# Altium PCB layout_altium.pcbdoc
Units mil, origin at the board's own origin, x right, y up, seen from the top; angles counter-clockwise.
Board outline 3480 x 4170.06 mil, 2 copper layers (Top Layer, Bottom Layer); 53 components, 61 nets, 223 pads, 89 vias.
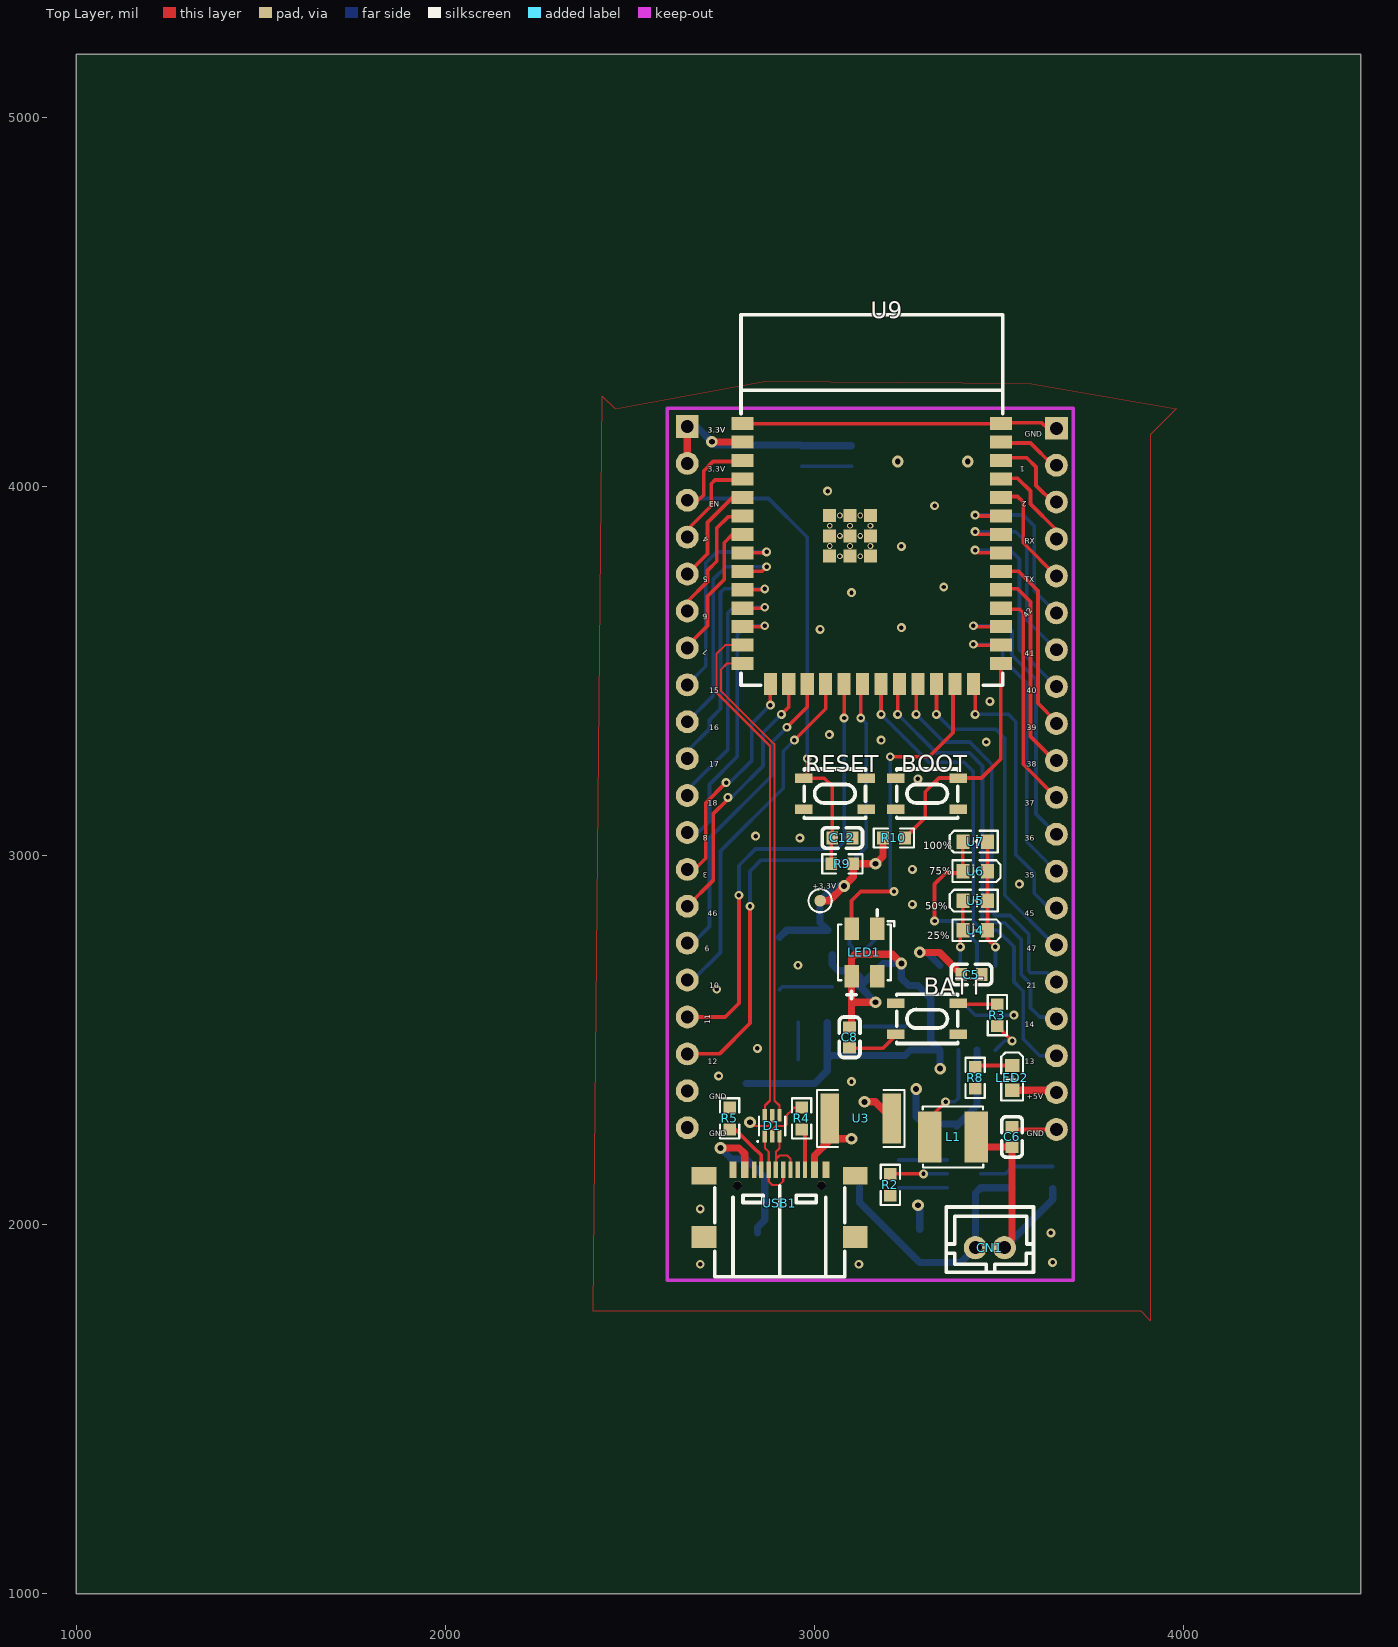
[diagram p0: Top Layer view]
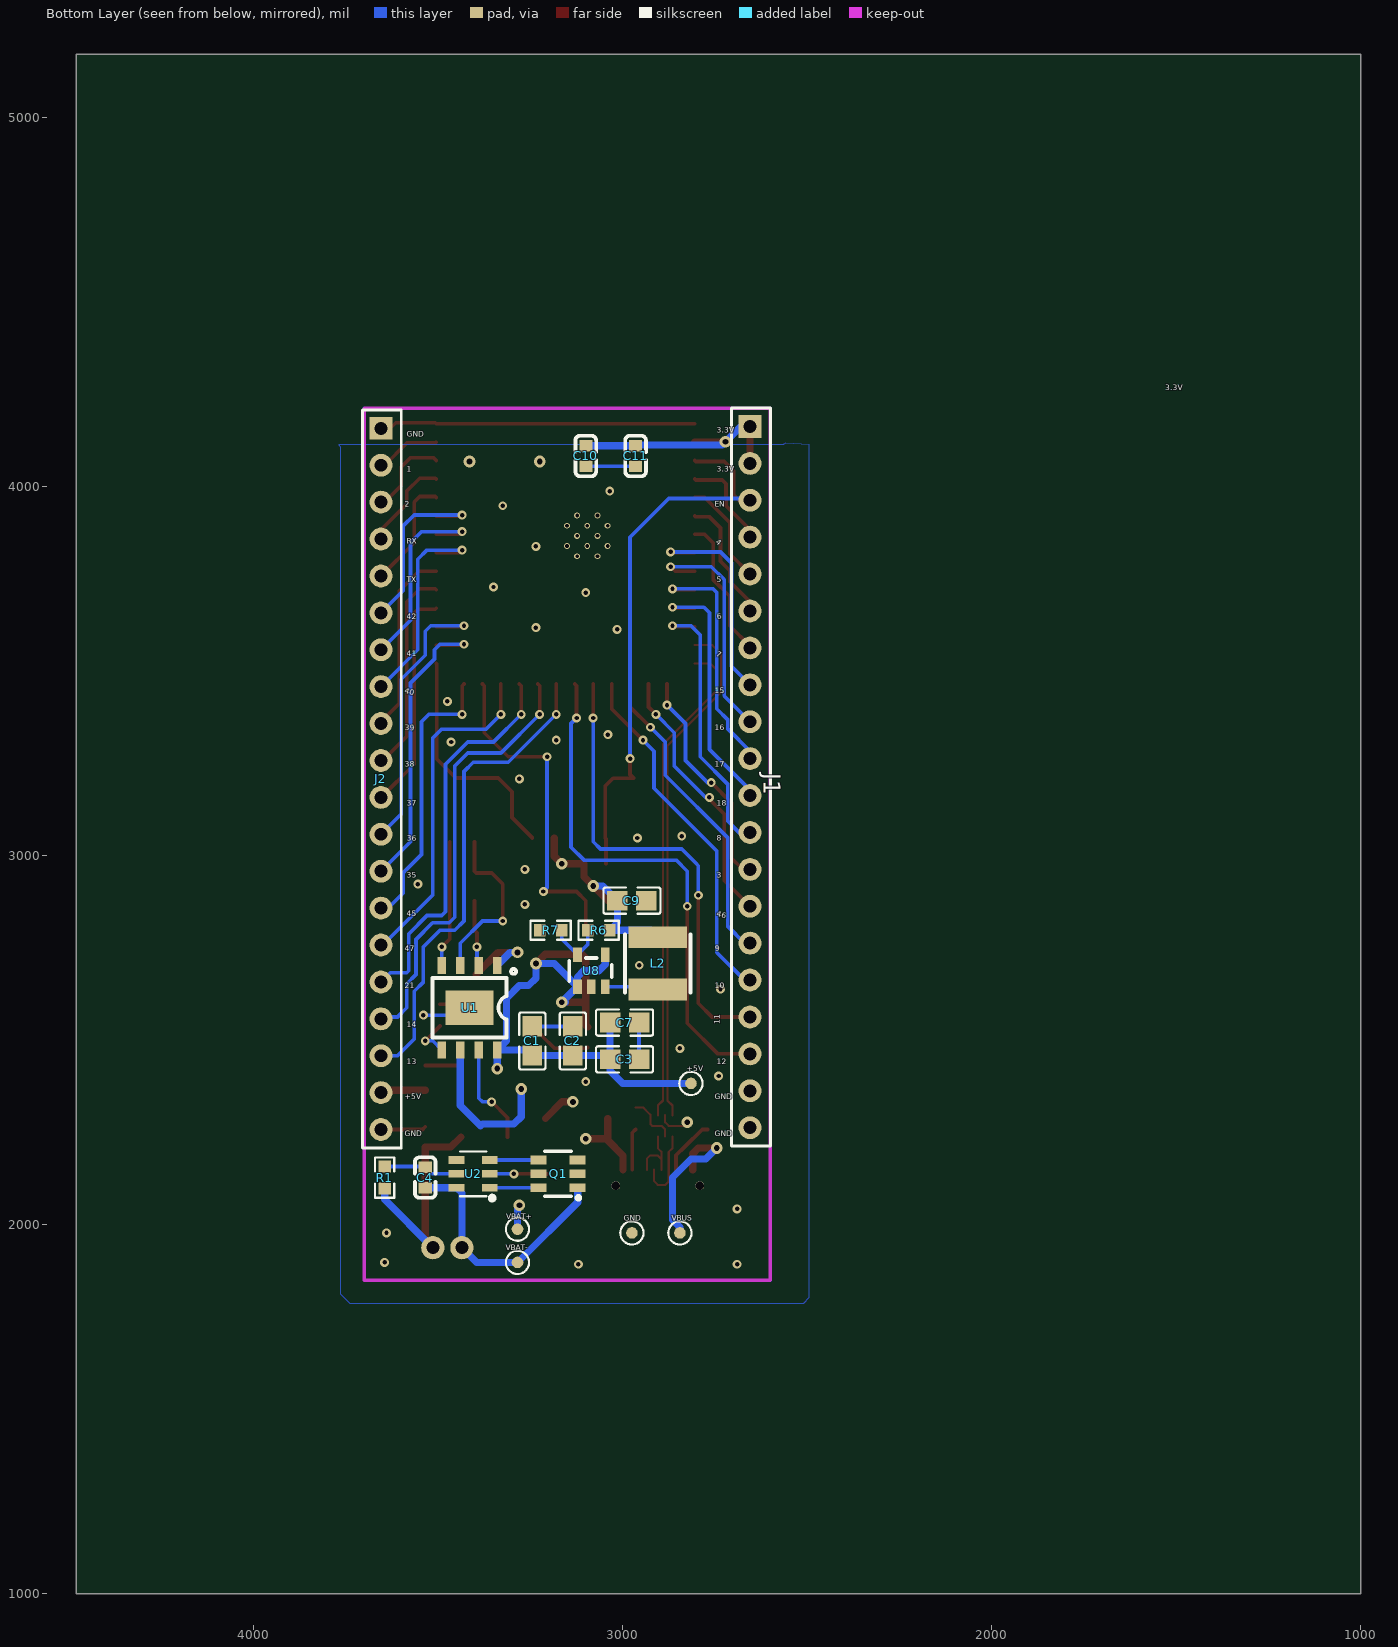
[diagram p1: Bottom Layer view, seen from below]

## Layer stack, top to bottom
Top Layer: signal copper (thickness not stored)
Dielectric: dielectric 12.6, FR-4, Dk 4.8
Bottom Layer: signal copper (thickness not stored)

## Board outline
4480,1000 1000,1000 1000,5170.06 4480,5170.06

## Components (designator, comment, footprint, x,y, rotation, side; value= is the part's Value field where it differs from the comment)
+3.3V "3.3v" TEST_POINT_W1 3015,2877.16 r0 top
+5V "5v" TEST_POINT_W1 2815,2382.16 r0 bottom
BATT "ip5306_switch" SW-SMD_4P-L4.2-W3.4-P2.15-LS5.2 3305,2557.16 r0 top
BOOT "Boot" SW-SMD_4P-L4.2-W3.4-P2.15-LS5.2 3305,3167.16 r0 top
C1 "22u" C0805 3245,2497.16 r90 bottom
C2 "22u" C0805 3135,2497.16 r90 bottom
C3 "22u" C0805 2995,2447.16 r180 bottom
C4 "0.1u" C0603#1 3535,2127.16 r90 bottom
C5 "10u" C0603#2 3425,2677.16 r180 top
C6 "10u" C0603#2 3535,2237.16 r270 top
C7 "22u" C0805 2995,2547.16 r0 bottom
C8 "10u" C0603#2 3095,2507.16 r90 top
C9 "22u" C0805 2975,2877.16 r180 bottom
C10 "0.1u" C0603#1 3100,4082.16 r90 bottom
C11 "10u" C0603#1 2965,4082.16 r90 bottom
C12 "1u" C0603#2 3075,3047.16 r180 top
CN1 "Battery" CONN-TH_B2B-PH-K-S 3475,1937.16 r0 top
D1 "USBLC6-2P6" SOT-666-6_L1.6-W1.2-P0.50-LS1.6-BR 2885,2267.16 r270 top
GND "GND" TEST_POINT_W1 2975,1977.16 r0 bottom
J1 "left" HDR-M-2.54_1X20 2655,3212.16 r90 bottom
J2 "Right" HDR-M-2.54_1X20 3655,3207.16 r90 bottom
L1 "1uH" IND-SMD_L4.0-W4.0 3375,2237.16 r0 top
L2 "2.2uH" IND-SMD_L4.0-W4.0_LQH44PN2R2MP0L 2905,2707.16 r90 bottom
LED1 "WS2812B-3535" LED-SMD_4P-L3.5-W3.5-TL_WS2812B 3135,2737.16 r90 top
LED2 "power" LED0603-FD 3535,2397.16 r90 top
Q1 "FS8205A_C2830320" SOT-23-6_L2.9-W1.6-P0.95-LS2.8-BR 3175,2137.16 r0 bottom
R1 "100R" R0603#1 3645,2127.16 r90 bottom
R2 "1k" R0603#2 3205,2107.16 r90 top
R3 "10k" R0603#2 3495,2567.16 r90 top
R4 "5.1kΩ" R0603#2 2965,2287.16 r90 top
R5 "5.1kΩ" R0603#2 2770,2287.16 r270 top
R6 "453k" R0603#1 3065,2797.16 r0 bottom
R7 "100k" R0603#1 3195,2797.16 r0 bottom
R8 "470R" R0603#2 3435,2397.16 r270 top
R9 "10k" R0603#2 3075,2977.16 r180 top
R10 "10k" R0603#2 3215,3047.16 r0 top
RESET "reset" SW-SMD_4P-L4.2-W3.4-P2.15-LS5.2 3055,3167.16 r0 top
U1 "IP5306" ESOP-8_L4.9-W3.9-P1.27-LS6.0-BL-EP 3415,2587.16 r180 bottom
U2 "DW01A_C351410" SOT-23-6_L2.9-W1.6-P0.95-LS2.8-BL 3405,2137.16 r270 bottom
U3 "PTC" R1812 3125,2287.16 r0 top
U4 "25%" LED0603-FD 3434.97,2797.16 r0 top
U5 "50%" LED0603-FD 3434.97,2877.16 r180 top
U6 "75%" LED0603-FD 3434.97,2957.16 r0 top
U7 "100%" LED0603-FD 3434.97,3037.16 r180 top
U8 "RY3420" SOT-23-5_L2.9-W1.6-P0.95-LS2.8-BL 3085,2687.16 r0 bottom
U9 "ESP32-S3-WROOM-1-N8" WIFIM-SMD_ESP32-S3-WROOM-1-N8 3155,3817.16 r0 top
USB1 "TYPE-C 16P QTWT" USB-TYPE-C-SMD_TYPE-C-16P-QTWT 2905,2057.16 r0 top
VBAT+ "Vbat+" TEST_POINT_W1 3285,1987.16 r0 bottom
VBAT- "Vbat-" TEST_POINT_W1 3285,1897.16 r0 bottom
VBUS "Vbus" TEST_POINT_W1 2845,1977.16 r0 bottom
? "" ? 3155,4414.12 r0 top
? "" ? 2327.87,3029.66 r0 top
? "" ? 3150,1677.08 r0 top

## Footprints (in the part's own frame and the unit in brackets; to place one, negate y for a bottom-side part, rotate by r counter-clockwise, add the part's x,y. Pads: shape width x height; smd on the part's side, far side on the other; paste and mask are expansions set on the pad)
C0603#1 [mm]
  rect 0.8x0.9 smd paste+0 mask+0.051: 1(0.7,0) 2(-0.7,0)
  silkscreen extent -1.39,-0.71 1.39,0.71
C0603#2 [mm]
  rect 0.8x0.9 smd paste+0 mask+0.051: 1(-0.7,0) 2(0.7,0)
  silkscreen extent -1.39,-0.71 1.39,0.71
C0805 [mm]
  rect 1.41x1.35 smd paste-100 mask+0.051: 1(1,0) 2(-1,0)
  silkscreen extent -1.96,-0.9 1.96,0.9
CONN-TH_B2B-PH-K-S [mm]
  round 1.6 hole 0.9 paste+0 mask+0.051: 1(1,0) 2(-1,0)
  silkscreen extent -3,-1.7 3,2.8
ESOP-8_L4.9-W3.9-P1.27-LS6.0-BL-EP [mm]
  rect 0.6x1.2 smd paste+0 mask+0.051: 1(1.905,2.908) 2(0.635,2.908) 3(-0.635,2.908) 4(-1.905,2.908) 5(-1.905,-2.908) 6(-0.635,-2.908) 7(0.635,-2.908) 8(1.905,-2.908)
  rect 3.3x2.4 smd paste+0 mask+0.051: 9(0,0)
  silkscreen extent -2.55,-2.05 3.2,2.67
HDR-M-2.54_1X20 [mil]
  rect 62x62 hole 35 paste+0 mask+2: 1(950,0)
  round 62 hole 35 paste+0 mask+2: 2(850,0) 3(750,0) 4(650,0) 5(550,0) 6(450,0) 7(350,0) 8(250,0) 9(150,0) 10(50,0) 11(-50,0) 12(-150,0) 13(-250,0) 14(-350,0) 15(-450,0) 16(-550,0) 17(-650,0) 18(-750,0) 19(-850,0) 20(-950,0)
  silkscreen extent -1000,-55 1000,50
IND-SMD_L4.0-W4.0 [mm]
  rect 1.6x3.5 smd paste+0 mask+0.051: 1(-1.6,0) 2(1.6,0)
  silkscreen extent -2.08,-2.1 2.08,2.1
IND-SMD_L4.0-W4.0_LQH44PN2R2MP0L [mm]
  rect 1.5x4 smd paste+0 mask+0.051: 1(1.8,0) 2(-1.8,0)
  silkscreen extent -2,-2.25 2,2.25
LED0603-FD [mm]
  rect 0.9x1 smd paste+0 mask+0.051: 1(-0.85,0) 2(0.85,0)
  silkscreen extent -1.55,-0.75 1.75,0.75
LED-SMD_4P-L3.5-W3.5-TL_WS2812B [mm]
  rect 1.545x0.997 smd paste+0 mask+0.051: 1(-1.638,0.89) 2(-1.638,-0.89) 3(1.638,-0.89) 4(1.638,0.89)
  silkscreen extent -3.17,-2.04 2.92,1.82
R0603#1 [mil]
  rect 31.75x34.02 smd paste-3937.01 mask+2: 1(29.66,0) 2(-29.65,0)
  silkscreen extent -55,-26 55,26
R0603#2 [mil]
  rect 31.75x34.02 smd paste-3937.01 mask+2: 1(-29.65,0) 2(29.66,0)
  silkscreen extent -55,-26 55,26
R1812 [mil]
  rect 50.49x136.06 smd paste-3937.01 mask+2: 1(-84.3,0) 2(84.3,0)
  silkscreen extent -119,-77 119,77
SOT-23-5_L2.9-W1.6-P0.95-LS2.8-BL [mm]
  rect 0.6x1 smd paste+0 mask+0.05: 1(0.95,1.1) 2(0,1.1) 3(-0.95,1.1) 4(-0.95,-1.1) 5(0.95,-1.1)
  silkscreen extent -1.4,-0.89 1.52,0.7
SOT-23-6_L2.9-W1.6-P0.95-LS2.8-BL [mm]
  rect 0.532x1.072 smd paste+0 mask+0.051: 1(0.95,1.149) 2(0,1.149) 3(-0.95,1.149) 4(-0.95,-1.149) 5(0,-1.149) 6(0.95,-1.149)
  silkscreen extent -1.54,-0.89 1.82,1.45
SOT-23-6_L2.9-W1.6-P0.95-LS2.8-BR [mm]
  rect 1.1x0.6 smd paste+0 mask+0.051: 1(-1.35,0.95) 2(-1.35,0) 3(-1.35,-0.95) 4(1.35,-0.95) 5(1.35,0) 6(1.35,0.95)
  silkscreen extent -1.52,-1.55 0.9,1.78
SOT-666-6_L1.6-W1.2-P0.50-LS1.6-BR [mm]
  rect 0.85x0.3 smd paste+0 mask+0.051: 1(0.725,-0.5) 2(0.725,0) 3(0.725,0.5) 4(-0.725,0.5) 5(-0.725,0) 6(-0.725,-0.5)
  silkscreen extent -0.65,-1 1.07,0.9
SW-SMD_4P-L4.2-W3.4-P2.15-LS5.2 [mm]
  rect 1.2x0.65 smd paste+0 mask+0.051: 1(-2.15,1.075) 2(2.15,1.075) 3(-2.15,-1.075) 4(2.15,-1.075)
  silkscreen extent -2.1,-1.7 2.1,1.7
TEST_POINT_W1 [mm]
  round 0.8 smd paste+0 mask+0.05: 1(0,0)
  silkscreen extent -0.8,-0.8 0.8,0.8
USB-TYPE-C-SMD_TYPE-C-16P-QTWT [mm]
  rect 1.7x1.5 smd paste+0 mask+0.051: 0(-5.2,-2.309) 0(5.2,-2.309)
  rect 1.7x1.2 smd paste+0 mask+0.051: 0(-5.2,1.891) 0(5.2,1.891)
  rect 0.5x1.14 smd paste+0 mask+0.051: A1B12(-3.2,2.308) A4B9(-2.4,2.308) B1A12(3.2,2.308) B4A9(2.4,2.308)
  rect 0.3x1.14 smd paste+0 mask+0.051: A5(-1.25,2.308) A6(-0.25,2.308) A7(0.25,2.308) A8(1.25,2.309) B5(1.75,2.308) B6(0.75,2.308) B7(-0.75,2.308) B8(-1.75,2.309)
  round 0.6 hole 0.6 unplated paste+0: ""(-2.89,1.221) ""(2.89,1.221)
  silkscreen extent -4.46,-5.05 4.48,1.2
WIFIM-SMD_ESP32-S3-WROOM-1-N8 [mm]
  rect 1.5x0.9 smd paste+0 mask+0.05: 1(-8.9,8.955) 2(-8.9,7.685) 3(-8.9,6.415) 4(-8.9,5.145) 5(-8.9,3.875) 6(-8.9,2.605) 7(-8.9,1.335) 8(-8.9,0.065) 9(-8.9,-1.205) 10(-8.9,-2.475) 11(-8.9,-3.745) 12(-8.9,-5.015) 13(-8.9,-6.285) 14(-8.9,-7.555) 27(8.9,-7.555) 28(8.9,-6.285) 29(8.9,-5.015) 30(8.9,-3.745) 31(8.9,-2.475) 32(8.9,-1.205) 33(8.9,0.065) 34(8.9,1.335) 35(8.9,2.605) 36(8.9,3.875) 37(8.9,5.145) 38(8.9,6.415) 39(8.9,7.685) 40(8.9,8.955)
  rect 0.9x1.5 smd paste+0 mask+0.05: 15(-6.985,-8.955) 16(-5.715,-8.955) 17(-4.445,-8.955) 18(-3.175,-8.955) 19(-1.905,-8.955) 20(-0.635,-8.955) 21(0.635,-8.955) 22(1.905,-8.955) 23(3.175,-8.955) 24(4.445,-8.955) 25(5.715,-8.955) 26(6.985,-8.955)
  rect 0.9x0.9 smd paste+0 mask+0.051: 41(-2.9,-0.165) 41(-2.9,1.235) 41(-2.9,2.635) 41(-1.5,-0.165) 41(-1.5,1.235) 41(-1.5,2.635) 41(-0.1,-0.165) 41(-0.1,1.235) 41(-0.1,2.635)
  silkscreen extent -9,-9.05 9,16.45
? [mil]

## Via types
v1: diameter 24.02, hole 12.01, Top Layer to Bottom Layer, tented both sides, 62 vias
v2: diameter 31.5, hole 15.75, Top Layer to Bottom Layer, tented both sides, 15 vias
v3: diameter 15.75, hole 9.84, Top Layer to Bottom Layer, tented both sides, 12 vias

## Nets (pads, with @x,y where several pads share a name; then routed paths per layer and width w, separated by ;. In a path a pad name is that pad's centre, name@x,y a point inside that pad or via, vN(x,y) a via of type N, cw(c..) or ccw(c..) an arc to the next point about the centre after c; other vN are vias at no path point)
3.3V: +3.3V.1 C9.2 C10.1 C11.1 J1.1 J1.2 L2.1 R6.2 R9.1 R10.1 U9.2 | length 2871.6
  Top Layer w19.68: J1.2 J1.1 ; v2(2721.59,4120.57) U9.2 ; +3.3V.1 3040,2877.16 v2(3080,2917.16) 3104.66,2941.82 R9.1 v2(3165,2977.16) 3185.34,2997.5 R10.1
  Mid-Layer 2 w19.68: v2(2721.59,4120.57) 2866.59,4120.57 2885,4102.16 2885,3932.16 2945,3872.16 2945,3577.16 2815,3447.16 2815,3152.16 2875,3092.16 3050,3092.16 v2(3165,2977.16)
  Bottom Layer w19.68: J1.1 2680,4162.16 v2(2721.59,4120.57) 2730,4112.16 2962.56,4112.16 C11.1 C10.1 ; L2.1 2924.13,2797.16 R6.2 3014.37,2818.13 C9.2 3054.37,2917.16 v2(3080,2917.16)
+5V: +5V.1 C1.2 C2.2 C3.2 C7.1 C8.2 J2.19 LED1.1 LED2.1 U1.8 U8.1 U8.4 | length 2260.6
  Top Layer w19.68: C8.2 3099.96,2539.68 LED1.1 3099.96,2722.12 3110,2732.16 3210,2732.16 v2(3235,2707.16) ; 3099.96,2594.04 3108.08,2602.16 v2(3165,2602.16) ; LED2.1 3648.47,2363.7 J2.19
  Mid-Layer 2 w19.68: v2(3340,2422.16) 3340,2397.16 3375,2362.16 3650,2362.16 J2.19
  Bottom Layer w19.68: +5V.1 3000,2382.16 3034.37,2416.53 C3.2 ; C7.1 C3.2 ; U8.4 3047.6,2704.56 3065,2687.16 3106,2687.16 3122.4,2670.76 U8.1 ; v2@3155,2602.16 v2(3165,2602.16) 3123.31,2643.85 U8.1 ; v2(3340,2422.16) U1.8 ; C3.2 3045,2457.79 C2.2 C1.2 3259.87,2472.66 U1.8 ; U8.1 3185.71,2707.16 v2(3235,2707.16) 3235,2667.16 3255,2647.16 3280,2647.16 3315,2612.16 3315,2497.66 U1.8
BATT_2: BATT.2 R3.2 | length 106.5
  Top Layer w10: BATT.2 3392.31,2596.82 R3.2
BOOT: BOOT.2 R10.2 U9.27 | length 648
  Top Layer w10: R10.2 3300,3102.5 3300,3172.16 3337.32,3209.49 BOOT.2 ; BOOT.2 3452.3,3209.46 3504,3261.16 3504,3518.36 U9.27
D_ESD_N: D1.6 U9.13 | length 1396.5
  Top Layer w5.95: 2733.95,3503.16 2733.95,3441.17 2752.95,3422.17 2878.98,3296.15 2878.98,2376.1 2878.98,2336.1 2865.32,2322.44 D1.6 ; 2734,3503.16 2734,3546.16 2757.5,3569.66 U9.13
D_ESD_P: D1.4 U9.14 | length 1338.7
  Top Layer w5.95: U9.14 2762.55,3519.7 2746,3503.16 2746,3446.16 2891.02,3301.14 2891.02,2336.1 2904.68,2322.44 D1.4
D_N: D1.1 USB1.A7 USB1.B7 | length 204.5
  Top Layer w5.98: D1.1 2865.32,2206.84 2875.47,2196.7 USB1.B7 ; USB1.B7@2875.5,2148.06 2875.5,2116.66 2885,2107.16 2905,2107.16 2914.8,2117.36 USB1.A7@2914.8,2148.06
D_P: D1.3 USB1.A6 USB1.B6 | length 171.3
  Top Layer w5.98: USB1.A6@2895.2,2148.06 2895.2,2196.96 2904.7,2206.86 D1.3@2904.7,2238.66 ; 2895.2,2177.16 2905,2186.96 2925,2187.16 2934.5,2177.66 USB1.B6@2934.5,2148.06
EN: C12.2 J1.3 R9.2 RESET.1 U9.3 | length 1556.8
  Top Layer w10: J1.3 2685,3962.16 2700,3977.16 2700,4042.16 2725,4067.16 2802.07,4067.16 U9.3 ; RESET.1 2980,3219.13 v1(2980,3262.16) ; RESET.1 3026,3209.16 3047.4,3187.76 C12.2 ; R9.2 3045.34,3045.06 C12.2
  Bottom Layer w10: J1.3 2660,3967.16 2875,3967.16 2980,3862.16 v1(2980,3262.16)
GND: BATT.3 BOOT.3 C1.1 C2.1 C3.1 C5.1 C6.1 C7.2 C8.1 C9.1 C10.2 C11.2 C12.1 D1.2 GND.1 J1.19 J1.20 J2.1 J2.20 LED1.3 Q1.3 R2.1 R4.2 R5.1 R7.1 R8.2 RESET.3 RESET.4 U1.9 U8.2 U9.1 U9.40 U9.41 USB1.0 USB1.A1B12 USB1.B1A12 | length 1740.3
  Top Layer w5.95: D1.2 2884.99,2257.16 2895,2267.16 2920,2267.16 2925,2272.16 2925,2297.16 2939,2311.16 2944.66,2316.82 R4.2
  Top Layer w10: U9.1 U9.40 3507.84,4172.16 3615,4172.16 3630,4157.16 J2.1 ; C8.1 3097.44,2477.16 3185,2477.16 3220.36,2512.51 BATT.3 ; C6.1 3542.56,2257.16 J2.20
  Bottom Layer w10: C3.1 C7.2 ; C11.2 C10.2 ; C2.1 C1.1 ; U1.9 3435,2567.16 v1(3540,2567.16)
  other v1: 2690,1892.16 3120,1892.16 3645,1897.16 3640,1977.16 2690,2042.16 3100,2387.16 2740,2402.16 2845,2477.16 2735,2637.16 2955,2702.16 3265,2867.16 3555,2922.16 3265,2962.16 2960,3047.16 2840,3052.16 3280,3207.16 3465,3307.16 3180,3312.16 3040,3327.16 3475,3417.16 3015,3612.16 3235,3617.16 3100,3712.16 3350,3727.16 3235,3837.16 3325,3947.16 3035,3987.16
  other v2: 3225,4067.16 3415,4067.16
IO1: J2.2 U9.39 | length 175.5
  Top Layer w10: U9.39 3507.93,4117.16 3585,4117.16 3645,4057.16 J2.2
IO2: J2.3 U9.38 | length 231.7
  Top Layer w10: U9.38 3512.84,4077.16 3575,4077.16 3600,4052.16 3600,4002.16 3645,3957.16 J2.3
IO3: J1.13 U9.15 | length 613.2
  Top Layer w10: J1.13 2675,2962.16 2705,2992.16 2705,3142.16 v1(2760,3197.16) ; v1(2880,3407.16) U9.15
  Bottom Layer w10: v1(2760,3197.16) 2770,3197.16 2830,3257.16 2830,3277.16 2830,3357.16 v1(2880,3407.16)
IO4: J1.4 U9.4 | length 261.7
  Top Layer w10: J1.4 2655,3882.16 2720,3947.16 2720,4007.16 2730,4017.16 2802.07,4017.16 U9.4
IO5: J1.5 U9.5 | length 285.4
  Top Layer w10: J1.5 2710,3817.16 2710,3902.16 2777.55,3969.7 U9.5
IO6: J1.6 U9.6 | length 341.2
  Top Layer w10: J1.6 2655,3687.16 2710,3742.16 2710,3772.16 2735,3797.16 2735,3887.16 2765,3917.16 2802.07,3917.16 U9.6
IO7: J1.7 U9.7 | length 385.4
  Top Layer w10: J1.7 2655,3567.16 2710,3622.16 2710,3702.16 2755,3747.16 2755,3847.16 2777.55,3869.7 U9.7
IO8: J1.12 U9.12 | length 755.2
  Top Layer w10: U9.12 2862.55,3619.7 v1(2865,3622.16)
  Bottom Layer w10: J1.12 2685,3062.16 2715,3092.16 2715,3192.16 2790,3267.16 2790,3597.16 2815,3622.16 v1(2865,3622.16)
IO9: J1.15 U9.17 | length 845.9
  Top Layer w10: v1(2925,3347.16) 2980.01,3402.16 U9.17
  Bottom Layer w10: J1.15 2670,2762.16 2715,2807.16 2715,3047.16 2885,3217.16 2885,3307.16 v1(2925,3347.16)
IO10: J1.16 U9.18 | length 966.6
  Top Layer w10: v1(2945,3312.16) 3030.01,3397.16 U9.18
  Bottom Layer w10: J1.16 2670,2662.16 2745,2737.16 2745,3012.16 2915,3182.16 2915,3282.16 v1(2945,3312.16)
IO11: J1.17 U9.19 | length 1267.7
  Top Layer w10: J1.17 2758,2562.16 2795,2599.16 v1(2795,2892.16) ; v1(3080,3372.16) U9.19@3080,3464.66
  Bottom Layer w10: v1(2795,2892.16) 2795,2972.16 2800,2977.16 2840,3017.16 2890,3017.16 3060,3017.16 3080,3037.16 3080,3087.16 v1(3080,3372.16)
IO12: J1.18 U9.20 | length 1409
  Top Layer w10: J1.18 2742,2462.16 2825,2545.16 v1(2825,2862.16) ; v1(3125,3372.16) 3125,3459.61 U9.20
  Bottom Layer w10: v1(2825,2862.16) 2825,2957.16 2855,2987.16 2900,2987.16 2955,2987.16 3105,2987.16 3140,3022.16 3140,3357.16 v1(3125,3372.16)
IO13: J2.18 U9.21 | length 1309.7
  Top Layer w10: v1(3180,3382.16) U9.21@3180,3464.66
  Bottom Layer w10: v1(3180,3382.16) 3310,3252.16 3405,3252.16 3430,3227.16 3430,2822.16 3455,2797.16 3495,2797.16 3540,2752.16 3540,2657.16 3565,2632.16 3565,2502.16 3610,2457.16 J2.18
IO14: J2.17 U9.22 | length 1190.2
  Top Layer w10: v1(3225,3382.16) 3225,3459.61 U9.22
  Bottom Layer w10: v1(3225,3382.16) 3330,3277.16 3420,3277.16 3455,3242.16 3455,2832.16 3470,2817.16 3515,2817.16 3560,2772.16 3560,2677.16 3585,2652.16 3585,2587.16 3610,2562.16 3650,2562.16 J2.17
IO15: J1.8 U9.8 | length 594.5
  Top Layer w10: U9.8 2867.55,3819.7 v1(2870,3822.16)
  Bottom Layer w10: J1.8 2705,3512.16 2705,3792.16 2735,3822.16 v1(2870,3822.16)
IO16: J1.9 U9.9 | length 644
  Top Layer w10: U9.9 2857.55,3769.7 v1(2870,3782.16)
  Bottom Layer w10: J1.9 2725,3432.16 2725,3747.16 2760,3782.16 v1(2870,3782.16)
IO17: J1.10 U9.10 | length 672.8
  Top Layer w10: U9.10 2862.55,3719.7 v1(2865,3722.16)
  Bottom Layer w10: J1.10 2655,3282.16 2715,3342.16 2715,3367.16 2745,3397.16 2745,3712.16 2755,3722.16 v1(2865,3722.16)
IO18: J1.11 U9.11 | length 708.2
  Top Layer w10: U9.11 2862.55,3669.7 v1(2865,3672.16)
  Bottom Layer w10: J1.11 2655,3177.16 2765,3287.16 2765,3657.16 2780,3672.16 v1(2865,3672.16)
IO21: J2.16 U9.23 | length 1057.7
  Top Layer w10: v1(3275,3382.16) 3275,3459.61 U9.23
  Bottom Layer w10: v1(3275,3382.16) 3350,3307.16 3420,3307.16 3480,3247.16 3480,2847.16 3490,2837.16 3530,2837.16 3580,2787.16 3580,2687.16 3585,2682.16 3630,2682.16 J2.16
IO35: J2.13 U9.28 | length 822.7
  Top Layer w10: v1(3430,3572.16) 3432.45,3569.7 U9.28
  Bottom Layer w10: v1(3430,3572.16) 3495,3572.16 3510,3557.16 3510,3532.16 3575,3467.16 3575,3037.16 J2.13
IO36: J2.12 U9.29 | length 787.3
  Top Layer w10: v1(3430,3622.16) 3432.45,3619.7 U9.29
  Bottom Layer w10: v1(3430,3622.16) 3520,3622.16 3535,3607.16 3535,3542.16 3600,3477.16 3600,3112.16 J2.12
IO37: J2.11 U9.30 | length 602.1
  Top Layer w10: U9.30 3507.93,3667.16 3555,3667.16 3565,3657.16 3565,3247.16 J2.11
IO38: J2.10 U9.31 | length 557.1
  Top Layer w10: U9.31 3507.84,3722.16 3550,3722.16 3585,3687.16 3585,3322.16 3650,3257.16 J2.10
IO39: J2.9 U9.32 | length 502.1
  Top Layer w10: U9.32 3552.45,3769.7 3605,3717.16 3605,3412.16 3655,3362.16 J2.9
IO40: J2.8 U9.33 | length 590.2
  Top Layer w10: v1(3435,3827.16) 3442.45,3819.7 U9.33
  Bottom Layer w10: v1(3435,3827.16) 3530,3827.16 3555,3802.16 3555,3557.16 J2.8
IO41: J2.7 U9.34 | length 549
  Top Layer w10: v1(3435,3877.16) 3442.45,3869.7 U9.34
  Bottom Layer w10: v1(3435,3877.16) 3545,3877.16 3575,3847.16 3575,3637.16 J2.7
IO42: J2.6 U9.35 | length 503.7
  Top Layer w10: v1(3435,3922.16) 3437.45,3919.7 U9.35
  Bottom Layer w10: v1(3435,3922.16) 3565,3922.16 3595,3892.16 3595,3717.16 J2.6
IO45: J2.14 U9.26 | length 765.1
  Top Layer w10: U9.26 3435,3459.62 v1(3435,3382.16)
  Bottom Layer w10: v1(3435,3382.16) 3525,3382.16 3545,3362.16 3545,3002.16 3595,2952.16 3595,2897.16 3635,2857.16 J2.14
IO46: J1.14 U9.16 | length 722.2
  Top Layer w10: J1.14 2725,2932.16 2725,3112.16 2765,3152.16 v1(2765,3157.16) ; v1(2910,3382.16) 2930,3402.16 U9.16
  Bottom Layer w10: v1(2765,3157.16) 2775,3157.16 2785,3167.16 2860,3242.16 2860,3277.16 2860,3332.16 v1(2910,3382.16)
IO47: J2.15 U9.24 | length 915.3
  Top Layer w10: v1(3330,3382.16) U9.24@3330,3464.66
  Bottom Layer w10: v1(3330,3382.16) 3370,3342.16 3490,3342.16 3515,3317.16 3515,2892.16 3650,2757.16 J2.15
LED1: U1.2 U4.1 U5.2 | length 180.3
  Top Layer w10: v1(3395,2752.16) 3395,2790.62 U4.1 U5.2
  Bottom Layer w10: U1.2 3395,2706.66 v1(3395,2752.16)
LED2: U1.3 U6.1 U7.2 | length 520
  Top Layer w10: v1(3325,2822.16) 3325,2922.16 3355,2952.16 ; U7.2 U6.1 ; 3355,2952.16 U6.1@3396.53,2952.16 ; 3355,2952.16 U6.1@3396.53,2952.16 ; U6.1@3396.53,2952.16 U6.1 ; U6.1@3396.53,2952.16 U6.1
  Bottom Layer w10: v1(3325,2822.16) 3380,2822.16 3440,2762.16 U1.3
LED2_2: LED2.2 R8.1 | length 101.6
  Top Layer w10: R8.1 3438.8,2430.62 LED2.2
LED3: U1.4 U4.2 U5.1 U6.2 U7.1 | length 344.4
  Top Layer w10: U7.1@3468.47,3037.16 3468.47,2957.16 3468.47,2877.16 3468.47,2797.16 3468.47,2773.7 v1(3490,2752.16)
  Bottom Layer w10: U1.4 v1(3490,2752.16)
LED48: LED1.4 U9.25 | length 902
  Top Layer w10: LED1.4@3099.96,2801.16 3100,2802.16 3100,2877.16 3125,2902.16 3185,2902.16 v1(3215,2902.16) ; v1(3205,3267.16) 3310,3267.16 3375,3332.16 3375,3459.61 U9.25
  Bottom Layer w10: v1(3205,3267.16) 3205,2912.16 v1(3215,2902.16)
Q1_4: Q1.4 U2.3 | length 131.6
  Bottom Layer w10: Q1.4 U2.3
Q1_6: Q1.6 U2.1 | length 131.6
  Bottom Layer w10: Q1.6 U2.1
RXD0: J2.4 U9.37 | length 254.1
  Top Layer w10: U9.37 3507.84,4022.16 3550,4022.16 3585,3987.16 3585,3952.16 3655,3882.16 J2.4
TXD0: J2.5 U9.36 | length 304.1
  Top Layer w10: U9.36 3507.84,3972.16 3550,3972.16 3565,3957.16 3565,3847.16 J2.5
U1_5: R3.1 U1.5 | length 112.2
  Top Layer w10: R3.1 v1(3535,2497.5) v1@3535,2497.16
  Bottom Layer w10: U1.5 3514.84,2497.5 v1(3535,2497.5)
U1_7: L1.1 U1.7 | length 282.4
  Top Layer w10: L1.1 3312.01,2289.17 v1(3355,2332.16)
  Bottom Layer w10: v1(3355,2332.16) 3380,2332.16 3390,2342.16 U1.7
U2_2: R2.2 U2.2 | length 154.8
  Top Layer w10: R2.2@3205,2136.86 v1(3295,2137.16)
  Bottom Layer w10: v1(3295,2137.16) U2.2
U2_5: C4.1 R1.1 U2.5 | length 202.9
  Bottom Layer w10: U2.5 3517.44,2137.16 C4.1 3537.1,2156.82 R1.1
U8_3: L2.2 U8.3 | length 145.7
  Bottom Layer w10: L2.2 2912.56,2643.85 U8.3
U8_5: R6.1 R7.2 U8.5 | length 162.7
  Bottom Layer w10: R6.1 3094.66,2758.21 U8.5 3165.34,2773.41 R7.2
USB1_A5: R5.2 USB1.A5 | length 153.9
  Top Layer w10: R5.2 2784.66,2257.5 2831,2211.16 2855.8,2187.36 USB1.A5@2855.8,2148.06
USB1_B5: R4.1 USB1.B5 | length 113.2
  Top Layer w10: R4.1 2973.89,2248.61 USB1.B5
VBAT+: C6.2 CN1.1 L1.2 R1.2 U1.6 VBAT+.1 | length 1710.2
  Top Layer w19.68: L1.2 3465.55,2209.6 C6.2 3535,1962.16 3514.37,1941.53 CN1.1
  Mid-Layer 2 w19.68: v2(3275,2367.16) 3275,2357.16 3255,2337.16 3255,2077.16 v2(3280,2052.16) 3399.37,2052.16 CN1.1
  Bottom Layer w19.68: v2(3275,2367.16) 3275,2357.16 3275,2292.16 3295,2272.16 3380,2272.16 3385,2267.16 3440,2322.16 U1.6 ; v2(3280,2052.16) 3285,2047.16 VBAT+.1 ; CN1.1 3645,2067.79 R1.2
VBAT-: C4.2 CN1.2 Q1.1 U2.6 VBAT-.1 | length 690.8
  Bottom Layer w19.68: Q1.1 3121.85,2060.31 VBAT-.1 3395.63,1897.16 CN1.2 3435.63,2085.15 U2.6 ; U2.6 C4.2
VBUS: U3.1 USB1.A4B9 USB1.B4A9 VBUS.1 | length 1030.2
  Top Layer w19.68: v2(2745,2207.16) 2795,2207.16 2810.51,2191.64 USB1.A4B9 ; USB1.B4A9 2999.49,2186.64 3040.7,2227.86 U3.1 ; 3026.11,2213.27 3045,2232.16 v2(3100,2232.16)
  Mid-Layer 2 w19.68: v2(2745,2207.16) 2770,2232.16 v2(3100,2232.16)
  Bottom Layer w19.68: v2(2745,2207.16) 2775,2177.16 2815,2177.16 2865,2127.16 2865,2012.16 2845,1992.16 VBUS.1
VIN: C5.2 D1.5 U1.1 U3.2 | length 1186.7
  Top Layer w5.95: v2(2825,2277.16) 2835,2267.16 2875,2267.16 2884.99,2277.16 D1.5
  Top Layer w19.68: v2(3135,2332.16) 3164.3,2332.16 U3.2 ; v2(3285,2737.16) 3337.44,2737.16 C5.2
  Mid-Layer 2 w19.68: v2(2825,2277.16) 2880,2332.16 v2(3135,2332.16) 3285,2482.16 v2(3285,2737.16)
  Bottom Layer w19.68: v2(3285,2737.16) 3304.5,2737.16 U1.1
pads on no net: BATT.1 BATT.4 BOOT.1 BOOT.4 LED1.2 Q1.2 Q1.5 RESET.2 U2.4 USB1. USB1.A8 USB1.B8
copper on no net:
  other v3: 3068.4,3810.66 3123.51,3810.66 3040.84,3838.22 3095.96,3838.22 3151.08,3838.22 3068.4,3865.78 3123.51,3865.78 3040.84,3893.34 3095.96,3893.34 3151.08,3893.34 3068.4,3920.9 3123.51,3920.9

## Polygon pours and split planes (outlines as drawn)
GND on Bottom Layer (solid): 2560,4117.16 2565,4112.16 3770,4112.16 3765,4107.16 3765,1812.16 3740,1787.16 2510,1787.16 2495,1802.16 2495,4112.16
GND on Mid-Layer 2 (solid): 2455,4222.16 2515,4282.16 2515,4327.16 2575,4267.16 3735,4267.16 3760,4242.16 3760,1862.16 3665,1767.16 2955,1767.16 2895,1827.16 2415,1827.16 2395,1847.16 2395,1947.16
GND on Top Layer (solid): 2425,4244.66 2460,4209.66 2865,4284.66 3580,4279.66 3980,4209.66 3910,4139.66 3910,1739.66 3885,1764.66 2400,1764.66
GND on Internal Plane 1 (split plane): 274 vertices, not listed, extent 3396.17,1897.69 3553.84,1976.63
GND on Internal Plane 1 (split plane): 109 vertices, not listed, extent 3256.28,2028.44 3303.72,2075.88
GND on Internal Plane 1 (split plane): 94 vertices, not listed, extent 2773.34,2087.34 2809.11,2123.12
GND on Internal Plane 1 (split plane): 94 vertices, not listed, extent 3000.89,2087.34 3036.68,2123.12
GND on Internal Plane 1 (split plane): 95 vertices, not listed, extent 3276.91,2119.08 3313.09,2155.24
GND on Internal Plane 1 (split plane): 109 vertices, not listed, extent 2721.28,2183.44 2768.72,2230.88
GND on Internal Plane 1 (split plane): 109 vertices, not listed, extent 3076.28,2208.44 3123.72,2255.88
GND on Internal Plane 1 (split plane): 19 vertices, not listed, extent 3621.32,2223.47 3639.5,2241.66
GND on Internal Plane 1 (split plane): 19 vertices, not listed, extent 3670.5,2223.48 3688.68,2241.66
GND on Internal Plane 1 (split plane): 19 vertices, not listed, extent 2621.32,2228.47 2639.5,2246.66
GND on Internal Plane 1 (split plane): 19 vertices, not listed, extent 2670.5,2228.48 2688.68,2246.66
GND on Internal Plane 1 (split plane): 109 vertices, not listed, extent 2801.28,2253.44 2848.72,2300.88
GND on Internal Plane 1 (split plane): 19 vertices, not listed, extent 3670.5,2272.66 3688.68,2290.84
GND on Internal Plane 1 (split plane): 19 vertices, not listed, extent 3621.32,2272.66 3639.5,2290.85
GND on Internal Plane 1 (split plane): 19 vertices, not listed, extent 2670.5,2277.66 2688.68,2295.84
GND on Internal Plane 1 (split plane): 19 vertices, not listed, extent 2621.32,2277.66 2639.5,2295.85
GND on Internal Plane 1 (split plane): 109 vertices, not listed, extent 3111.28,2308.44 3158.72,2355.88
GND on Internal Plane 1 (split plane): 95 vertices, not listed, extent 3336.91,2314.08 3373.09,2350.24
GND on Internal Plane 1 (split plane): 139 vertices, not listed, extent 3616.03,2318.2 3693.97,2396.12
GND on Internal Plane 1 (split plane): 19 vertices, not listed, extent 2621.32,2328.47 2639.5,2346.66
GND on Internal Plane 1 (split plane): 19 vertices, not listed, extent 2670.5,2328.48 2688.68,2346.66
GND on Internal Plane 1 (split plane): 109 vertices, not listed, extent 3251.28,2343.44 3298.72,2390.88
GND on Internal Plane 1 (split plane): 19 vertices, not listed, extent 2670.5,2377.66 2688.68,2395.84
GND on Internal Plane 1 (split plane): 19 vertices, not listed, extent 2621.32,2377.66 2639.5,2395.85
GND on Internal Plane 1 (split plane): 109 vertices, not listed, extent 3316.28,2398.44 3363.72,2445.88
GND on Internal Plane 1 (split plane): 136 vertices, not listed, extent 3617.93,2420.08 3692.08,2494.24
GND on Internal Plane 1 (split plane): 136 vertices, not listed, extent 2617.93,2425.08 2692.08,2499.24
GND on Internal Plane 1 (split plane): 95 vertices, not listed, extent 3516.91,2479.42 3553.09,2515.58
GND on Internal Plane 1 (split plane): 136 vertices, not listed, extent 3617.93,2520.08 3692.08,2594.24
GND on Internal Plane 1 (split plane): 136 vertices, not listed, extent 2617.93,2525.08 2692.08,2599.24
GND on Internal Plane 1 (split plane): 109 vertices, not listed, extent 3141.28,2578.44 3188.72,2625.88
GND on Internal Plane 1 (split plane): 136 vertices, not listed, extent 3617.93,2620.08 3692.08,2694.24
GND on Internal Plane 1 (split plane): 136 vertices, not listed, extent 2617.93,2625.08 2692.08,2699.24
GND on Internal Plane 1 (split plane): 109 vertices, not listed, extent 3211.28,2683.44 3258.72,2730.88
GND on Internal Plane 1 (split plane): 109 vertices, not listed, extent 3261.28,2713.44 3308.72,2760.88
GND on Internal Plane 1 (split plane): 136 vertices, not listed, extent 3617.93,2720.08 3692.08,2794.24
GND on Internal Plane 1 (split plane): 136 vertices, not listed, extent 2617.93,2725.08 2692.08,2799.24
GND on Internal Plane 1 (split plane): 95 vertices, not listed, extent 3471.91,2734.08 3508.09,2770.24
GND on Internal Plane 1 (split plane): 95 vertices, not listed, extent 3376.91,2734.08 3413.09,2770.24
GND on Internal Plane 1 (split plane): 95 vertices, not listed, extent 3306.91,2804.08 3343.09,2840.24
GND on Internal Plane 1 (split plane): 136 vertices, not listed, extent 3617.93,2820.08 3692.08,2894.24
GND on Internal Plane 1 (split plane): 136 vertices, not listed, extent 2617.93,2825.08 2692.08,2899.24
GND on Internal Plane 1 (split plane): 95 vertices, not listed, extent 2806.91,2844.08 2843.09,2880.24
GND on Internal Plane 1 (split plane): 95 vertices, not listed, extent 2776.91,2874.08 2813.09,2910.24
GND on Internal Plane 1 (split plane): 95 vertices, not listed, extent 3196.91,2884.08 3233.09,2920.24
GND on Internal Plane 1 (split plane): 109 vertices, not listed, extent 3056.28,2893.44 3103.72,2940.88
GND on Internal Plane 1 (split plane): 136 vertices, not listed, extent 3617.93,2920.08 3692.08,2994.24
GND on Internal Plane 1 (split plane): 136 vertices, not listed, extent 2617.93,2925.08 2692.08,2999.24
GND on Internal Plane 1 (split plane): 109 vertices, not listed, extent 3141.28,2953.44 3188.72,3000.88
GND on Internal Plane 1 (split plane): 136 vertices, not listed, extent 3617.93,3020.08 3692.08,3094.24
GND on Internal Plane 1 (split plane): 136 vertices, not listed, extent 2617.93,3025.08 2692.08,3099.24
GND on Internal Plane 1 (split plane): 136 vertices, not listed, extent 3617.93,3120.08 3692.08,3194.24
GND on Internal Plane 1 (split plane): 136 vertices, not listed, extent 2617.93,3125.08 2692.08,3199.24
GND on Internal Plane 1 (split plane): 95 vertices, not listed, extent 2746.91,3139.08 2783.09,3175.24
GND on Internal Plane 1 (split plane): 95 vertices, not listed, extent 2741.91,3179.08 2778.09,3215.24
GND on Internal Plane 1 (split plane): 136 vertices, not listed, extent 3617.93,3220.08 3692.08,3294.24
GND on Internal Plane 1 (split plane): 136 vertices, not listed, extent 2617.93,3225.08 2692.08,3299.24
GND on Internal Plane 1 (split plane): 95 vertices, not listed, extent 2961.91,3244.08 2998.09,3280.24
GND on Internal Plane 1 (split plane): 95 vertices, not listed, extent 3186.91,3249.08 3223.09,3285.24
GND on Internal Plane 1 (split plane): 95 vertices, not listed, extent 2926.91,3294.08 2963.09,3330.24
GND on Internal Plane 1 (split plane): 136 vertices, not listed, extent 3617.93,3320.08 3692.08,3394.24
GND on Internal Plane 1 (split plane): 136 vertices, not listed, extent 2617.93,3325.08 2692.08,3399.24
GND on Internal Plane 1 (split plane): 95 vertices, not listed, extent 2906.91,3329.08 2943.09,3365.24
GND on Internal Plane 1 (split plane): 95 vertices, not listed, extent 3106.91,3354.08 3143.09,3390.24
GND on Internal Plane 1 (split plane): 95 vertices, not listed, extent 3061.91,3354.08 3098.09,3390.24
GND on Internal Plane 1 (split plane): 95 vertices, not listed, extent 3161.91,3364.08 3198.09,3400.24
GND on Internal Plane 1 (split plane): 95 vertices, not listed, extent 3206.91,3364.08 3243.09,3400.24
GND on Internal Plane 1 (split plane): 95 vertices, not listed, extent 3256.91,3364.08 3293.09,3400.24
GND on Internal Plane 1 (split plane): 95 vertices, not listed, extent 3311.91,3364.08 3348.09,3400.24
GND on Internal Plane 1 (split plane): 95 vertices, not listed, extent 3416.91,3364.08 3453.09,3400.24
GND on Internal Plane 1 (split plane): 95 vertices, not listed, extent 2891.91,3364.08 2928.09,3400.24
GND on Internal Plane 1 (split plane): 95 vertices, not listed, extent 2861.91,3389.08 2898.09,3425.24
GND on Internal Plane 1 (split plane): 136 vertices, not listed, extent 3617.93,3420.08 3692.08,3494.24
GND on Internal Plane 1 (split plane): 136 vertices, not listed, extent 2617.93,3425.08 2692.08,3499.24
GND on Internal Plane 1 (split plane): 136 vertices, not listed, extent 3617.93,3520.08 3692.08,3594.24
GND on Internal Plane 1 (split plane): 136 vertices, not listed, extent 2617.93,3525.08 2692.08,3599.24
GND on Internal Plane 1 (split plane): 95 vertices, not listed, extent 3411.91,3554.08 3448.09,3590.24
GND on Internal Plane 1 (split plane): 95 vertices, not listed, extent 2846.91,3604.08 2883.09,3640.24
GND on Internal Plane 1 (split plane): 95 vertices, not listed, extent 3411.91,3604.08 3448.09,3640.24
GND on Internal Plane 1 (split plane): 136 vertices, not listed, extent 3617.93,3620.08 3692.08,3694.24
GND on Internal Plane 1 (split plane): 136 vertices, not listed, extent 2617.93,3625.08 2692.08,3699.24
GND on Internal Plane 1 (split plane): 95 vertices, not listed, extent 2846.91,3654.08 2883.09,3690.24
GND on Internal Plane 1 (split plane): 95 vertices, not listed, extent 2846.91,3704.08 2883.09,3740.24
GND on Internal Plane 1 (split plane): 136 vertices, not listed, extent 3617.93,3720.08 3692.08,3794.24
GND on Internal Plane 1 (split plane): 136 vertices, not listed, extent 2617.93,3725.08 2692.08,3799.24
GND on Internal Plane 1 (split plane): 95 vertices, not listed, extent 2851.91,3764.08 2888.09,3800.24
GND on Internal Plane 1 (split plane): 84 vertices, not listed, extent 3054.45,3796.7 3082.36,3824.62
GND on Internal Plane 1 (split plane): 84 vertices, not listed, extent 3109.56,3796.7 3137.47,3824.62
GND on Internal Plane 1 (split plane): 95 vertices, not listed, extent 2851.91,3804.08 2888.09,3840.24
GND on Internal Plane 1 (split plane): 95 vertices, not listed, extent 3416.91,3809.08 3453.09,3845.24
GND on Internal Plane 1 (split plane): 136 vertices, not listed, extent 3617.93,3820.08 3692.08,3894.24
GND on Internal Plane 1 (split plane): 84 vertices, not listed, extent 3026.89,3824.26 3054.8,3852.18
GND on Internal Plane 1 (split plane): 84 vertices, not listed, extent 3137.13,3824.26 3165.04,3852.18
GND on Internal Plane 1 (split plane): 84 vertices, not listed, extent 3082.01,3824.26 3109.92,3852.18
GND on Internal Plane 1 (split plane): 136 vertices, not listed, extent 2617.93,3825.08 2692.08,3899.24
GND on Internal Plane 1 (split plane): 84 vertices, not listed, extent 3054.45,3851.82 3082.36,3879.74
GND on Internal Plane 1 (split plane): 84 vertices, not listed, extent 3109.56,3851.82 3137.47,3879.74
GND on Internal Plane 1 (split plane): 95 vertices, not listed, extent 3416.91,3859.08 3453.09,3895.24
GND on Internal Plane 1 (split plane): 84 vertices, not listed, extent 3026.89,3879.38 3054.8,3907.3
GND on Internal Plane 1 (split plane): 84 vertices, not listed, extent 3137.13,3879.38 3165.04,3907.3
GND on Internal Plane 1 (split plane): 84 vertices, not listed, extent 3082.01,3879.38 3109.92,3907.3
GND on Internal Plane 1 (split plane): 95 vertices, not listed, extent 3416.91,3904.08 3453.09,3940.24
GND on Internal Plane 1 (split plane): 84 vertices, not listed, extent 3054.45,3906.94 3082.36,3934.86
GND on Internal Plane 1 (split plane): 84 vertices, not listed, extent 3109.56,3906.94 3137.47,3934.86
GND on Internal Plane 1 (split plane): 136 vertices, not listed, extent 3617.93,3920.08 3692.08,3994.24
GND on Internal Plane 1 (split plane): 136 vertices, not listed, extent 2617.93,3925.08 2692.08,3999.24
GND on Internal Plane 1 (split plane): 136 vertices, not listed, extent 3617.93,4020.08 3692.08,4094.24
GND on Internal Plane 1 (split plane): 139 vertices, not listed, extent 2616.03,4023.2 2693.97,4101.12
GND on Internal Plane 1 (split plane): 109 vertices, not listed, extent 2697.87,4096.85 2745.31,4144.29
GND on Internal Plane 1 (split plane): 34 vertices, not listed, extent 3670.5,4120.18 3691.98,4141.66
GND on Internal Plane 1 (split plane): 34 vertices, not listed, extent 3618.02,4120.18 3639.5,4141.66
GND on Internal Plane 1 (split plane): 137 vertices, not listed, extent 2616.13,4123.29 2693.87,4201.03
GND on Internal Plane 1 (split plane): 34 vertices, not listed, extent 3670.5,4172.66 3691.98,4194.14
GND on Internal Plane 1 (split plane): 34 vertices, not listed, extent 3618.02,4172.66 3639.5,4194.14

## Silkscreen, mask and mechanical layers (free items; w line width, h text height)
Top Overlay:
  text "3.3V" at 2710,4144.66 h15
  text "3.3V" at 2710,4144.66 h15
  text "GND" at 3570,4134.66 h15
  text "1" at 3570,4054.66 h15 r180
  text "3.3V" at 2710,4039.66 h15
  text "2" at 3575,3959.66 h15 r180
  text "EN" at 2715,3944.66 h15
  text "4" at 2714.41,3858.23 h15 r144
  text "RX" at 3570,3844.66 h15
  text "5" at 2710,3754.66 h15 r180
  text "TX" at 3570,3739.66 h15
  text "6" at 2709.35,3654.63 h15 r185
  text "42" at 3576.07,3642.75 h15 r54
  text "7" at 2713.17,3553.96 h15 r155
  text "41" at 3570,3539.66 h15
  text "15" at 2715,3439.66 h15
  text "40" at 3575,3439.66 h15
  text "16" at 2715,3339.66 h15
  text "39" at 3575,3339.66 h15
  text "17" at 2715,3239.66 h15
  text "38" at 3575,3239.66 h15
  text "18" at 2710,3134.66 h15
  text "37" at 3570,3134.66 h15
  text "8" at 2710,3054.66 h15 r180
  text "36" at 3570,3039.66 h15
  text "3" at 2710,2954.66 h15 r180
  text "35" at 3570,2939.66 h15
  text "46" at 2710,2834.66 h15
  text "45" at 3570,2834.66 h15
  text "9" at 2714.35,2754.63 h15 r185
  text "47" at 3575,2739.66 h15
  text "10" at 2715,2639.66 h15
  text "21" at 3575,2639.66 h15
  text "11" at 2717.5,2542.16 h15 r90
  text "14" at 3570,2534.66 h15
  text "12" at 2710,2434.66 h15
  text "13" at 3570,2434.66 h15
  text "GND" at 2715,2339.66 h15
  text "+5V" at 3575,2339.66 h15
  text "GND" at 2715,2239.66 h15
  text "GND" at 3575,2239.66 h15
Bottom Overlay:
  text "3.3V" at 1530,4259.66 h15
  text "3.3V" at 2745,4144.66 h15
  text "GND" at 3585,4134.66 h15
  text "3.3V" at 2745,4039.66 h15
  text "1" at 3585,4039.66 h15
  text "EN" at 2750,3944.66 h15
  text "2" at 3590,3944.66 h15
  text "4" at 2749.41,3846.09 h15 r36
  text "RX" at 3585,3844.66 h15
  text "5" at 2745,3739.66 h15
  text "TX" at 3585,3739.66 h15
  text "6" at 2744.35,3639.69 h15 r355
  text "42" at 3585,3639.66 h15
  text "7" at 2748.17,3540.36 h15 r25
  text "41" at 3585,3539.66 h15
  text "15" at 2750,3439.66 h15
  text "40" at 3591.81,3439.88 h15 r14
  text "16" at 2750,3339.66 h15
  text "39" at 3590.26,3339.66 h15 r2
  text "17" at 2750,3239.66 h15
  text "38" at 3590,3239.66 h15
  text "18" at 2745,3134.66 h15
  text "37" at 3585,3134.66 h15
  text "8" at 2745,3039.66 h15
  text "36" at 3585.26,3039.66 h15 r2
  text "3" at 2745,2939.66 h15
  text "35" at 3585,2939.66 h15
  text "46" at 2746.81,2834.88 h15 r14
  text "45" at 3585,2834.66 h15
  text "9" at 2749.35,2739.69 h15 r355
  text "47" at 3590,2739.66 h15
  text "10" at 2750,2639.66 h15
  text "21" at 3590,2639.66 h15
  text "11" at 2737.5,2542.16 h15 r270
  text "14" at 3585,2534.66 h15
  text "12" at 2745,2434.66 h15
  text "13" at 3585,2434.66 h15
  text "GND" at 2750,2339.66 h15
  text "+5V" at 3590,2339.66 h15
  text "GND" at 2750,2239.66 h15
  text "GND" at 3590,2239.66 h15